# Altium PCB USB-PD-240W-PCB.PcbDoc (part 3 of 3)
Units mil, origin at the board's own origin, x right, y up, seen from the top; angles counter-clockwise.
Board outline 3858.27 x 2834.65 mil, 6 copper layers (L1 Top, L2 GND, L3 Power, L4 Power, L5 GND, L6 Bottom), stack 61.496 mil thick; 154 components, 83 nets, 633 pads, 831 vias.
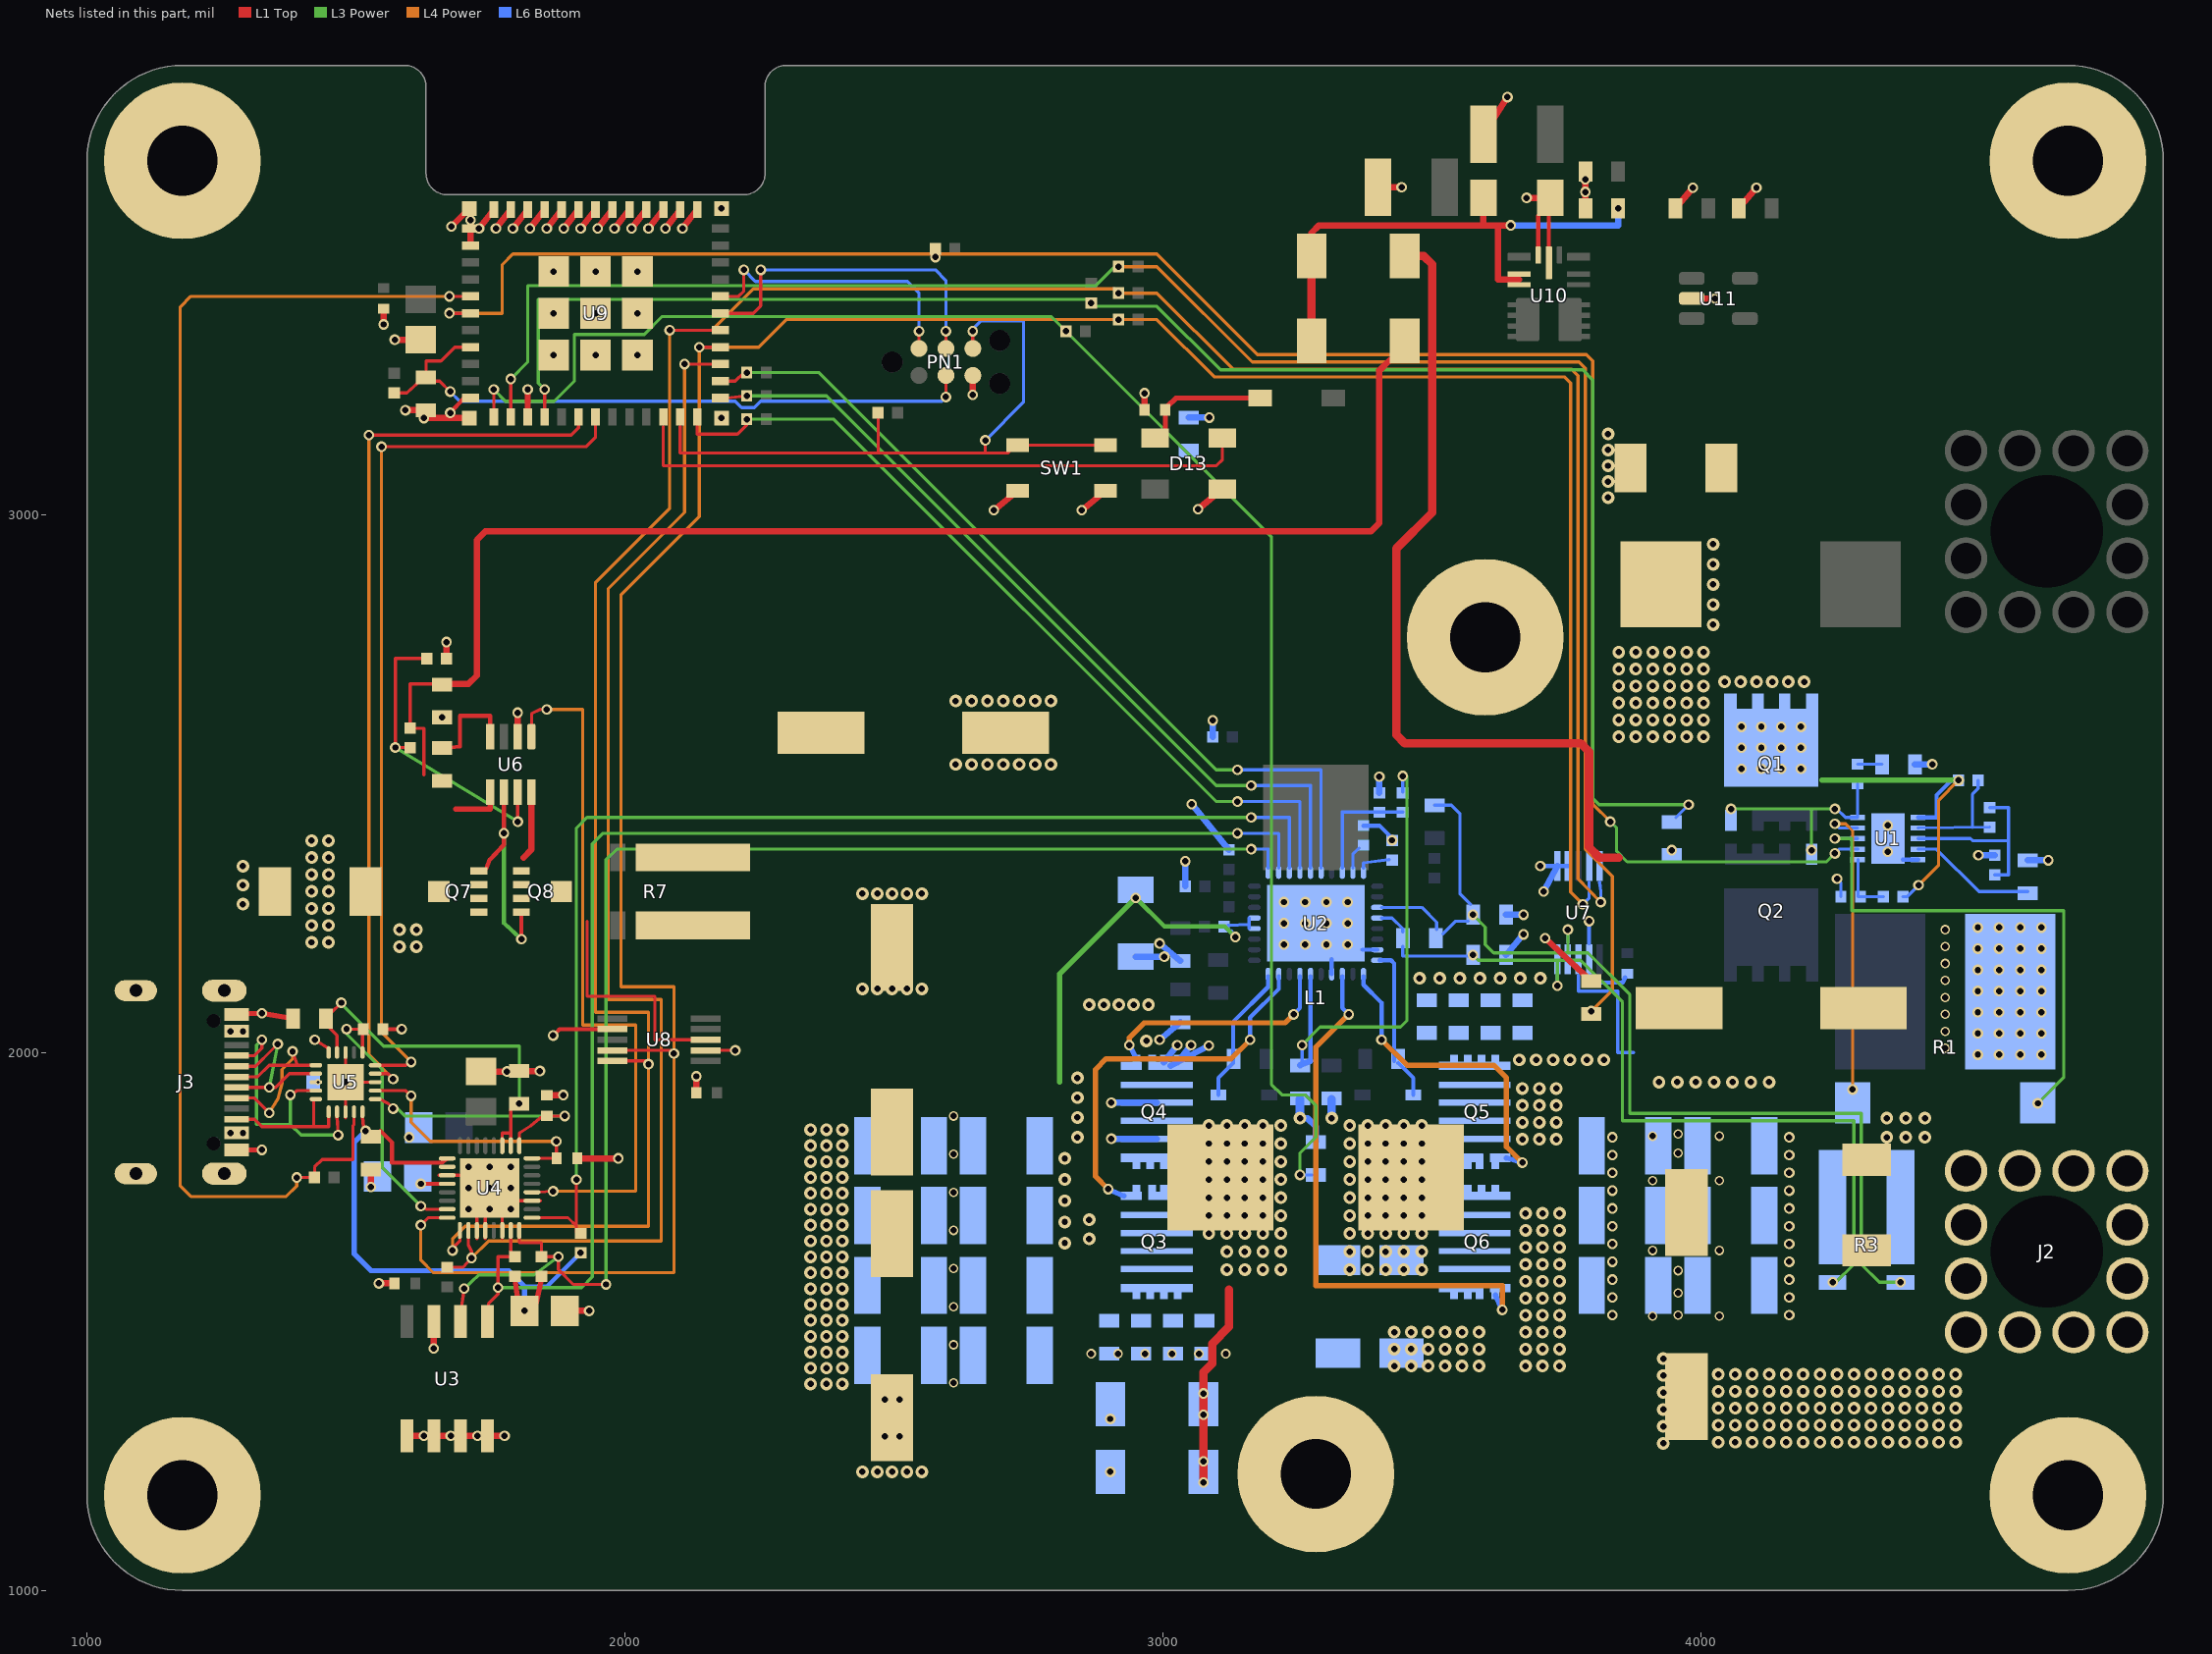
[diagram p6: the nets of this part, all layers, seen from the top]

## Via types
v1: diameter 23.62, hole 11.81, L1 Top to L6 Bottom, tented both sides, 435 vias
v2: diameter 19.68, hole 11.81, L1 Top to L6 Bottom, tented both sides, 351 vias
v3: diameter 17.72, hole 11.81, L1 Top to L6 Bottom, tented both sides, 35 vias
v4: diameter 23.62, hole 11.81, L1 Top to L6 Bottom, 9 vias
v5: diameter 11.81, hole 5.91, L1 Top to L6 Bottom, tented both sides, 1 vias

## Nets (pads, with @x,y where several pads share a name; then routed paths per layer and width w, separated by ;. In a path a pad name is that pad's centre, name@x,y a point inside that pad or via, vN(x,y) a via of type N, cw(c..) or ccw(c..) an arc to the next point about the centre after c; other vN are vias at no path point) (continued)
BQ_HIDRV1: Q3.G U2.27 | length 714.8
  L4 Power w9.84: v2(2897.64,1746.06) 2874.02,1769.68 2874.02,1968.5 2893.7,1988.19 3125.98,1988.19 v2(3161.42,2023.62)
  L6 Bottom w7.87: v2(3161.42,2023.62) 3161.42,2064.96 3214.57,2118.11 U2.27@3214.57,2141.73
  L6 Bottom w9.84: v2(2897.64,1746.06) Q3.G@2927.17,1733.27
BQ_HIDRV2: Q5.G U2.19 | length 594.1
  L4 Power w9.84: v2(3405.51,2023.62) 3452.76,1976.38 3614.17,1976.38 3637.8,1952.76 3637.8,1824.8 v2(3667.32,1795.28)
  L6 Bottom w7.87: U2.19@3372.05,2141.73 3372.05,2125.98 3405.51,2092.52 v2(3405.51,2023.62)
  L6 Bottom w9.84: Q5.G@3637.8,1804.13 v2(3667.32,1795.28)
BQ_ICHG: R17.2 U2.9 | length 42.3
  L6 Bottom w5.91: U2.9@3352.36,2342.52 3352.36,2368.11 R17.2@3364.17,2379.92
BQ_ILIM: R18.2 U2.10 | length 57.5
  L6 Bottom w5.91: U2.10@3372.05,2342.52 3372.05,2352.36 R18.2@3419.29,2358.27
BQ_INT: R24.1 U2.3 U4.17 | length 2256.8
  L1 Top w5.91: U4.17@1838.58,1692.91 1893.7,1692.91 1909.45,1677.17 ; R24.1@1909.45,1665.35 v2(1909.45,1763.78)
  L3 Power w5.91: v2(1909.45,1763.78) 1909.45,2417.32 1929.13,2437.01 v2(3163.39,2437.01)
  L6 Bottom w5.91: v2(3163.39,2437.01) 3234.25,2437.01 U2.3@3234.25,2342.52
BQ_LODRV1: Q4.G U2.25 | length 441.2
  L4 Power w9.84: v2(2937.01,2013.78) 2937.01,2027.56 2964.57,2055.12 3226.38,2055.12 v2(3242.13,2070.87)
  L6 Bottom w7.87: v2(3242.13,2070.87) 3253.94,2082.68 U2.25@3253.94,2141.73
  L6 Bottom w9.84: v2(2937.01,2013.78) Q4.G@2949.8,1988.19
BQ_LODRV2: Q6.G U2.21 | length 1027.1
  L4 Power w9.84: v2(3344.49,2070.87) 3283.46,2009.84 3283.46,1566.93 3629.92,1566.93 v2(3629.92,1521.65)
  L6 Bottom w7.87: U2.21@3332.68,2141.73 3332.68,2082.68 v2(3344.49,2070.87)
  L6 Bottom w9.84: Q6.G@3617.13,1549.21 v2(3629.92,1521.65)
BQ_PG: R27.1 U2.6 U9.26 | length 1599.7
  L1 Top w5.91: U9.26@2188.98,3248.03 2204.72,3248.03 2220.47,3263.78 v2(2225.98,3263.78)
  L3 Power w5.91: v2(2225.98,3263.78) 2360.24,3263.78 3098.43,2525.59 v2(3137.8,2525.59)
  L6 Bottom w5.91: v2(3137.8,2525.59) 3293.31,2525.59 U2.6@3293.31,2342.52
BQ_REGN: C36.2 R19.2 U2.24 | length 914
  L3 Power w5.91: v2(3257.87,2013.78) 3291.34,2047.24 3440.94,2047.24 3452.76,2059.06 3452.76,2513.78 v2(3444.88,2513.78)
  L6 Bottom w5.91: C36.2@3257.87,1984.25 v2(3257.87,2013.78) ; R19.2@3444.88,2484.25 v2(3444.88,2513.78)
  L6 Bottom w7.87: 3273.62,1984.25 U2.24@3273.62,2141.73
  L6 Bottom w11.81: C36.2@3253.94,1976.38 3273.62,1984.25
BQ_SRN: C32.2 C34.1 R3.4 R22.2 U2.13 U7.9 | length 1873.7
  L3 Power w5.91: v2(3575.59,2255.91) 3598.43,2233.07 3598.43,2200.79 3614.17,2185.04 3789.37,2185.04 3867.13,2107.28 3867.13,1886.81 4297.24,1886.81 4297.24,1606.3 4330.71,1572.83 v2(4370.08,1572.83) ; 3751.97,2185.04 v2(3751.97,2228.35)
  L6 Bottom w5.91: U2.13@3405.51,2269.68 3480.32,2269.68 3507.87,2242.13 C34.1@3507.87,2228.35 ; R22.2@3503.94,2459.84 3535.43,2459.84 3551.18,2444.09 3551.18,2295.28 3570.87,2275.59 ; C34.1@3519.68,2220.47 3543.31,2244.09 C32.2@3566.93,2244.09 ; 3751.97,2202.76 v2(3751.97,2228.35)
BQ_SRP: C31.2 C34.2 R3.3 U2.14 U7.10 | length 1544.7
  L3 Power w5.91: v2(3575.59,2181.1) 3585.43,2171.26 3775.59,2171.26 3853.35,2093.5 3853.35,1873.03 4283.46,1873.03 4283.46,1606.3 4250,1572.83 v2(4244.09,1572.83) ; v2(3732.28,2124.02) 3732.28,2171.26
  L6 Bottom w5.91: U2.14@3405.51,2250 3425.2,2250 3444.88,2230.32 C34.2@3444.88,2224.41 ; C34.2@3444.88,2196.85 3444.88,2179.13 C31.2@3566.93,2179.13 ; v2(3732.28,2124.02) 3732.28,2143.7
BQ_STAT1: R25.1 U2.4 U9.24 | length 1579.5
  L1 Top w5.91: U9.24@2133.86,3173.23 2133.86,3149.61 2208.66,3149.61 2225.98,3166.93 v2(2225.98,3177.17)
  L3 Power w5.91: v2(2225.98,3177.17) 2387.8,3177.17 3098.43,2466.54 v2(3137.8,2466.54)
  L6 Bottom w5.91: v2(3137.8,2466.54) 3253.94,2466.54 U2.4@3253.94,2342.52
BQ_STAT2: R26.1 U2.5 U9.25 | length 1538.5
  L1 Top w5.91: U9.25@2188.98,3216.54 v2(2225.98,3220.47)
  L3 Power w5.91: v2(2225.98,3220.47) 2374.02,3220.47 3098.43,2496.06 v2(3163.39,2496.06)
  L6 Bottom w5.91: v2(3163.39,2496.06) 3273.62,2496.06 U2.5@3273.62,2342.52
BQ_SW1: C38.1 D3.A D5.K D6.K L1.1 Q3.S Q4.D U2.28 | length 636.5
  L1 Top w15.75: v2(3074.8,1200.79) 3074.8,1405.51 3091.14,1421.85 3091.14,1458.66 3122.05,1490.16 3122.05,1559.06
  L6 Bottom w7.87: D3.A@3102.36,1921.26 3102.36,1952.76 3129.92,1980.32 3129.92,2057.09 3194.88,2122.05 U2.28@3194.88,2141.73
  other v1: 3118.11,1596.46 3151.57,1596.46 3185.04,1596.46 3218.5,1596.46 3118.11,1629.92 3151.57,1629.92 3185.04,1629.92 3218.5,1629.92 3084.65,1663.39 3118.11,1663.39 3151.57,1663.39 3185.04,1663.39 3218.5,1663.39 3084.65,1696.85 3118.11,1696.85 3151.57,1696.85 3185.04,1696.85 3218.5,1696.85 3084.65,1730.32 3118.11,1730.32 3151.57,1730.32 3185.04,1730.32 3218.5,1730.32 3084.65,1763.78 3118.11,1763.78 3151.57,1763.78 3185.04,1763.78 3218.5,1763.78 3084.65,1797.24 3118.11,1797.24 3151.57,1797.24 3185.04,1797.24 3218.5,1797.24 3084.65,1830.71 3118.11,1830.71 3151.57,1830.71 3185.04,1830.71 3218.5,1830.71 3084.65,1864.17 3118.11,1864.17 3151.57,1864.17 3185.04,1864.17 3218.5,1864.17
  other v2: 3074.8,1240.16 3074.8,1326.77 3074.8,1366.14
BQ_SW2: C39.1 D4.A D7.K D8.K L1.2 Q5.S Q6.D U2.18 | length 281.6
  L6 Bottom w7.87: U2.18@3401.57,2171.26 3423.23,2171.26 3429.13,2165.35 C39.1@3429.13,1984.25 ; C39.1@3437.01,1980.32 3464.57,1952.76 D4.A@3464.57,1921.26
  other v1: 3346.46,1596.46 3379.92,1596.46 3413.39,1596.46 3446.85,1596.46 3480.32,1596.46 3346.46,1629.92 3379.92,1629.92 3413.39,1629.92 3446.85,1629.92 3480.32,1629.92 3346.46,1663.39 3379.92,1663.39 3413.39,1663.39 3446.85,1663.39 3480.32,1663.39 3346.46,1696.85 3379.92,1696.85 3413.39,1696.85 3446.85,1696.85 3480.32,1696.85 3346.46,1730.32 3379.92,1730.32 3413.39,1730.32 3446.85,1730.32 3480.32,1730.32 3346.46,1763.78 3379.92,1763.78 3413.39,1763.78 3446.85,1763.78 3480.32,1763.78 3346.46,1797.24 3379.92,1797.24 3413.39,1797.24 3446.85,1797.24 3480.32,1797.24 3346.46,1830.71 3379.92,1830.71 3413.39,1830.71 3446.85,1830.71 3480.32,1830.71 3346.46,1864.17 3379.92,1864.17 3413.39,1864.17 3446.85,1864.17 3480.32,1864.17
BQ_TS: R19.1 R20.2 U2.8 | length 216.5
  L6 Bottom w5.91: U2.8@3332.68,2342.52 3332.68,2446.85 R19.1@3444.88,2446.85
CHS: J3.S1 J3.S2 J3.S3 J3.S4 MH1.1 MH2.1 MH3.1 MH4.1 MH5.1 MH6.1 R43.2
ESP_BOOT: PN1.6 R44.1 SW1.1 U9.23 | length 1260.6
  L1 Top w5.91: 2102.36,3163.39 2102.36,3114.17 2710.63,3114.17 SW1.1@2716.54,3120.08 ; 2470.08,3114.17 2470.08,3177.17 ; PN1.6@2646.06,3314.96 v2(2646.06,3340.55) ; 2669.29,3114.17 v2(2669.29,3137.8) ; SW1.1@2748.03,3128.94 SW1.1@2874.02,3128.94
  L6 Bottom w5.91: v2(2646.06,3340.55) 2646.06,3344.88 2661.42,3360.24 2740.16,3360.24 2740.16,3208.66 v2(2669.29,3137.8)
ESP_EN: C57.2 PN1.3 R34.1 U9.8 | length 1209.7
  L1 Top w5.91: R34.1@1570.87,3225.98 1594.49,3225.98 1614.17,3244.09 1629.92,3254.72 1629.92,3285.43 1657.48,3285.43 1683.07,3311.02 U9.8@1712.6,3311.02 ; C57.2@1641.73,3248.03 1655.12,3248.03 v2(1674.8,3228.35) ; v2(2596.06,3218.5) PN1.3@2596.06,3251.97
  L6 Bottom w5.91: v2(1674.8,3228.35) 1692.52,3210.63 2204.72,3210.63 2216.54,3198.82 2240.16,3198.82 2251.97,3210.63 2588.19,3210.63 v2(2596.06,3218.5)
ESP_RXD0: PN1.4 U9.30 | length 619.8
  L1 Top w5.91: U9.30@2177.17,3374.02 2238.19,3374.02 2251.97,3387.8 v2(2251.97,3454.72) ; PN1.4@2596.06,3314.96 v2(2596.06,3340.55)
  L6 Bottom w5.91: v2(2251.97,3454.72) 2576.38,3454.72 2596.06,3435.04 v2(2596.06,3340.55)
ESP_TXD0: PN1.2 U9.31 | length 526.7
  L1 Top w5.91: U9.31@2177.17,3405.51 2210.63,3405.51 2220.47,3415.35 v2(2220.47,3454.72) ; PN1.2@2546.06,3314.96 v2(2546.06,3340.55)
  L6 Bottom w5.91: v2(2220.47,3454.72) 2242.13,3433.07 2524.41,3433.07 2546.06,3411.42 v2(2546.06,3340.55)
ESP_USB_DN: U5.14 U9.17 | length 1652.6
  L1 Top w5.91: v2(1523.62,3147.64) 1899.61,3147.64 1913.39,3161.42 U9.17@1913.39,3173.23 ; U5.14@1543.31,1960.63 1559.06,1960.63 v2(1568.9,1950.79)
  L4 Power w5.91: v2(1523.62,3147.64) 1523.62,1996.06 v2(1568.9,1950.79)
ESP_USB_DP: U5.15 U9.18 | length 1661.7
  L1 Top w5.91: U5.15@1543.31,1976.38 1592.52,1976.38 v2(1602.36,1982.28) ; v2(1547.24,3125.98) 1927.17,3125.98 1944.88,3143.7 U9.18@1944.88,3173.23
  L4 Power w5.91: v2(1547.24,3125.98) 1547.24,2037.4 v2(1602.36,1982.28)
GND: C1.2 C2.2 C3.1 C4.1 C5.1 C6.1 C7.1 C8.1 C9.1 C10.1 C11.2 C12.1 C13.1 C14.1 C15.1 C16.1 C17.1 C18.2 C19.2 C20.1 C21.1 C22.1 C23.1 C24.1 C25.1 C26.1 C27.1 C28.1 C29.1 C30.1 C31.1 C32.1 C35.1 C36.1 C37.1 C40.1 C41.1 C42.1 C43.1 C45.1 C46.1 C47.1 C48.1 C49.1 C50.1 C51.1 C52.1 C53.1 C54.1 C55.1 C56.1 C57.1 C58.1 C59.1 C60.1 C61.1 C62.1 C63.1 C64.1 C65.1 C66.1 D1.A D2.A D5.A D6.A D7.A D8.A D9.A D13.1 J2.1 J3.A1_B12 J3.B1_A12 PN1.5 Q4.S Q6.S R4.2 R5.2 R6.2 R10.1 R15.1 R16.1 R17.1 R18.1 R20.1 R21.1 R29.1 R41.1 R42.1 R43.1 SW1.2 U1.5 U1.11 U2.17 U2.22 U2.37 U3.1 U3.2 U3.3 U3.4 U3.7 U4.3 U4.11 U4.12 U4.14 U4.19 U4.33 U5.8 U5.13 U5.18 U5.21 U6.2 U7.1 U7.2 U7.7 U8.2 U8.7 U9.1 U9.2 U9.11 U9.14 U9.36 U9.37 U9.38 U9.39 U9.40 U9.41 U9.42 U9.43 U9.44 U9.45 U9.46 U9.47 U9.48 U9.49 U9.50 U9.51 U9.52 U9.53 U10.10 U10.11 U11.2 | length 4603.6
  L1 Top w5.91: 1480.32,1877.95 U5.21@1480.32,1917.32 ; U5.21@1480.32,1968.5 U5.18@1480.31,2000 ; U5.21@1511.81,1944.88 U5.13@1535.43,1944.88 ; 1653.54,1771.65 1692.91,1771.65 ; 1724.41,1653.54 1724.41,1692.91 ; 1740.16,1653.54 1740.16,1692.91 ; 1771.65,1653.54 1771.65,1692.91 ; U4.33@1803.15,1724.41 U4.19@1842.52,1724.41 ; U8.7@2149.61,2003.94 v2(2204.72,2003.94)
  L1 Top w7.87: R42.1@1549.61,2043.31 v2(1584.65,2043.31) ; v2(1674.8,3188.98) U9.11@1700.79,3216.54 ; v2(1866.14,2031.5) 1877.95,2043.31 U8.2@1976.38,2043.31 ; U10.11@3696.85,3476.38 3696.85,3555.12 ; U10.10@3716.54,3468.5 3716.54,3555.12
  L1 Top w9.84: J3.B1_A12@1277.56,1818.9 v2(1324.8,1818.9) ; J3.A1_B12@1277.56,2070.87 v2(1324.8,2072.83) C43.1@1382.68,2062.99
  L1 Top w11.81: v2(1527.56,1749.96) C42.1@1527.56,1782.44 ; v2(1542.32,1570.87) C52.1@1571.34,1570.87 ; v2(1551.18,3353.31) C55.1@1551.18,3382.36 ; v2(1571.85,3324.8) C56.1@1620.08,3324.8 ; v2(1591.54,3193.86) C57.1@1629.92,3193.87 ; U3.1@1594.29,1287.4 v2(1625.79,1287.4) ; v2(1625.98,3179.13) U9.52@1710.63,3179.13 ; U3.2@1644.29,1287.4 v2(1675.79,1287.4) ; v2(1644.29,1449.8) U3.7@1644.29,1500 ; R29.1@1667.81,2732.28 v2(1667.8,2762.8) ; v2(1677.17,3535.43) U9.53@1710.63,3568.9 ; U3.3@1694.29,1287.4 v2(1725.79,1287.4) ; U9.2@1712.6,3500 v2(1712.6,3547.24) ; v2(1728.35,3531.5) U9.48@1755.91,3566.93 ; C49.1@1732.28,1964.57 v2(1780.51,1964.57) ; U3.4@1744.29,1287.4 v2(1775.79,1287.4) ; v2(1759.84,3531.5) U9.47@1787.4,3566.93 ; v2(1791.34,3531.5) U9.46@1818.9,3566.93 ; U6.2@1800.2,2587.01 v2(1800.2,2631.5) ; C46.1@1803.15,1965.59 v2(1841.54,1965.59) ; U9.14@1818.9,3181.1 v2(1818.9,3232.28) ; v2(1822.83,3531.5) U9.45@1850.39,3566.93 ; C51.1@1854.33,1920.79 v2(1884.84,1920.79) ; v2(1854.33,3531.5) U9.44@1881.89,3566.93 ; v2(1885.83,3531.5) U9.43@1913.39,3566.93 ; C48.1@1887.8,1519.68 v2(1933.07,1519.68) ; C50.1@1910.95,1803.15 v2(1987.2,1803.15) ; v2(1917.32,3531.5) U9.42@1944.88,3566.93 ; v2(1948.82,3531.5) U9.41@1976.38,3566.93 ; v2(1980.32,3531.5) U9.40@2007.87,3566.93 ; v2(2011.81,3531.5) U9.39@2039.37,3566.93 ; v2(2043.31,3531.5) U9.38@2070.87,3566.93 ; v2(2074.8,3531.5) U9.37@2102.36,3566.93 ; v2(2106.3,3531.5) U9.36@2133.86,3566.93 ; C54.1@2132.36,1925.2 v2(2132.36,1955.71) ; v2(2646.06,3222.24) PN1.5@2646.06,3258.46 ; v2(2685.04,3007.87) SW1.2@2729.33,3044.29 ; v2(2848.43,3007.87) SW1.2@2892.72,3044.29 ; C66.1@2965.04,3194.88 v2(2965.04,3225.39) ; v2(3064.57,3009.84) D13.1@3109.84,3047.24 ; C61.1@3398.62,3608.27 v2(3442.91,3608.27) ; C62.1@3595.47,3706.69 v2(3639.76,3775.83) ; v2(3675.2,3588.58) C59.1@3719.49,3588.58 ; v2(3709.65,2212.6) R5.2@3795.27,2132.87 ; C58.1@3784.42,3568.9 v2(3784.41,3623.03) ; v2(3784.41,3599.41) C60.1@3784.42,3637.8 ; C63.1@3951.74,3568.9 v2(3984.21,3607.28) ; U11.2@3982.09,3401.57 v2(4025.59,3401.57) ; C64.1@4069.84,3568.9 v2(4102.32,3607.28)
  L6 Bottom w5.91: v2(4251.97,2322.83) 4259.45,2314.96 R41.1@4259.35,2289.37
  L6 Bottom w7.87: U2.22@3312.99,2145.67 U2.37@3312.99,2173.23 ; U2.37@3370.08,2190.94 U2.17@3397.64,2190.94 ; R17.1@3372.05,2421.65 3401.57,2421.65 R18.1@3425.2,2398.03 ; v2(3700.79,2346.46) U7.1@3732.28,2346.46 U7.2@3751.97,2346.46 ; 3791.34,2143.7 3791.34,2129.92 3854.33,2129.92 C53.1@3858.27,2139.76 ; 3791.34,2202.76 v2(3791.34,2244.09) ; U1.11@4374.02,2358.27 U1.5@4402.76,2358.27
  L6 Bottom w11.81: v2(2903.54,1839.57) Q4.S@2988.19,1839.57 ; v2(2903.54,1906.5) Q4.S@2988.19,1906.5 ; C35.1@2948.82,2178.15 v2(3001.97,2178.15) ; v2(2993.11,2023.58) C30.1@3031.5,2056.08 ; v2(2993.11,2202.72) C29.1@3031.5,2170.25 ; Q4.S@3000.98,1981.81 v2(3025.98,2013.78) ; Q4.S@3013.78,1975.39 v2(3084.65,2012.8) ; Q4.S@3026.57,1981.81 v2(3051.57,2013.78) ; R15.1@3040.85,2309.05 v2(3040.83,2355.32) ; R43.1@3047.24,3180.16 v2(3085.63,3180.16) ; v2(3052.91,2461.61) R16.1@3122.05,2376.48 ; R21.1@3092.03,2586.61 v2(3092.05,2617.13) ; v1(3253.94,1877.95) 3267.72,1877.95 3283.46,1862.2 R4.2@3283.46,1834.65 ; R20.1@3401.57,2482.78 v2(3401.57,2512.8) ; C31.1@3636.85,2181.1 v2(3669.33,2219.49) ; C32.1@3636.85,2255.91 v2(3669.33,2255.91) ; v2(3706.69,2299.21) U7.1@3732.28,2346.46 ; C28.1@4396.68,2535.83 v2(4429.17,2535.83) ; v2(4514.76,2366.61) R10.1@4545.28,2366.63 ; C65.1@4606.3,2357.31 v2(4644.69,2357.32)
  L6 Bottom w15.75: v1(3253.94,1877.95) C36.1@3253.94,1913.39 ; v1(3312.99,1877.95) C37.1@3312.99,1913.39
  other v1: 2440.94,1220.47 2468.5,1220.47 2496.06,1220.47 2523.62,1220.47 2551.18,1220.47 3929.13,1273.62 4031.5,1275.59 4062.99,1275.59 4094.49,1275.59 4125.98,1275.59 4157.48,1275.59 4188.98,1275.59 4220.47,1275.59 4251.97,1275.59 4283.46,1275.59 4314.96,1275.59 4346.46,1275.59 4377.95,1275.59 4409.45,1275.59 4440.94,1275.59 4472.44,1275.59 3929.13,1305.12 4031.5,1307.09 4062.99,1307.09 4094.49,1307.09 4125.98,1307.09 4157.48,1307.09 4188.98,1307.09 4220.47,1307.09 4251.97,1307.09 4283.46,1307.09 4314.96,1307.09 4346.46,1307.09 4377.95,1307.09 4409.45,1307.09 4440.94,1307.09 4472.44,1307.09 3929.13,1336.61 4031.5,1338.58 4062.99,1338.58 4094.49,1338.58 4125.98,1338.58 4157.48,1338.58 4188.98,1338.58 4220.47,1338.58 4251.97,1338.58 4283.46,1338.58 4314.96,1338.58 4346.46,1338.58 4377.95,1338.58 4409.45,1338.58 4440.94,1338.58 4472.44,1338.58 3929.13,1368.11 4031.5,1370.08 4062.99,1370.08 4094.49,1370.08 4125.98,1370.08 4157.48,1370.08 4188.98,1370.08 4220.47,1370.08 4251.97,1370.08 4283.46,1370.08 4314.96,1370.08 4346.46,1370.08 4377.95,1370.08 4409.45,1370.08 4440.94,1370.08 4472.44,1370.08 3929.13,1399.61 4031.5,1401.57 4062.99,1401.57 4094.49,1401.57 4125.98,1401.57 4157.48,1401.57 4188.98,1401.57 4220.47,1401.57 4251.97,1401.57 4283.46,1401.57 4314.96,1401.57 4346.46,1401.57 4377.95,1401.57 4409.45,1401.57 4440.94,1401.57 4472.44,1401.57 3429.13,1417.32 3460.63,1417.32 3492.13,1417.32 3523.62,1417.32 3555.12,1417.32 3586.61,1417.32 3673.23,1417.32 3704.72,1417.32 3736.22,1417.32 3929.13,1431.1 3429.13,1448.82 3460.63,1448.82 3492.13,1448.82 3523.62,1448.82 3555.12,1448.82 3586.61,1448.82 3673.23,1448.82 3704.72,1448.82 3736.22,1448.82 3429.13,1480.32 3460.63,1480.32 3492.13,1480.32 3523.62,1480.32 3555.12,1480.32 3586.61,1480.32 3673.23,1480.32 3704.72,1480.32 3736.22,1480.32 3673.23,1511.81 3704.72,1511.81 3736.22,1511.81 3673.23,1543.31 3704.72,1543.31 3736.22,1543.31 3673.23,1574.8 3704.72,1574.8 3736.22,1574.8 3673.23,1606.3 3704.72,1606.3 3736.22,1606.3 3673.23,1637.8 3704.72,1637.8 3736.22,1637.8 3673.23,1669.29 3704.72,1669.29 3736.22,1669.29 3673.23,1700.79 3704.72,1700.79 3736.22,1700.79 2840.55,1842.52 2840.55,1879.25 2840.55,1916.02 2840.55,1952.76 2968.5,2021.65 2862.2,2088.58 2889.76,2088.58 2917.32,2088.58 2944.88,2088.58 2972.44,2088.58 2440.94,2118.11 2468.5,2118.11 2496.06,2118.11 2523.62,2118.11 2551.18,2118.11 3476.38,2137.8 3513.78,2137.8 3551.18,2137.8 3588.58,2137.8 3625.98,2137.8 3663.39,2137.8 3700.79,2137.8 1289.37,2275.59 2440.94,2295.28 2468.5,2295.28 2496.06,2295.28 2523.62,2295.28 2551.18,2295.28 1289.37,2311.02 1289.37,2346.46 2614.17,2535.43 2643.7,2535.43 2673.23,2535.43 2702.76,2535.43 2732.28,2535.43 2761.81,2535.43 2791.34,2535.43 2614.17,2653.54 2643.7,2653.54 2673.23,2653.54 2702.76,2653.54 2732.28,2653.54 2761.81,2653.54 2791.34,2653.54 3826.77,3031.5 3826.77,3061.02 3826.77,3090.55 3826.77,3120.08 3826.77,3149.61
  other v2: 2901.57,1220.47 2482.28,1286.42 2509.84,1286.42 2901.57,1318.9 2482.28,1355.32 2509.84,1355.32 1598.43,1842.52 1480.32,1944.88 3224.41,2200.79 3263.78,2200.79 3303.15,2200.79 3342.52,2200.79 3224.41,2240.16 3263.78,2240.16 3303.15,2240.16 3342.52,2240.16 3224.41,2279.53 3263.78,2279.53 3303.15,2279.53 3342.52,2279.53 4346.46,2373.23 3944.88,2375.98 3425.2,2394.49 4346.46,2422.05 1659.45,2622.83 2179.13,3179.13 1867.13,3296.26 1944.88,3296.26 2022.64,3296.26 1867.13,3374.02 1944.88,3374.02 2022.64,3374.02 1867.13,3451.77 1944.88,3451.77 2022.64,3451.77 2179.13,3568.9
  other v3: 2610.24,1385.83 2866.14,1440.16 2916.14,1440.16 2966.14,1440.16 3016.14,1440.16 3066.14,1440.16 3116.14,1440.16 2610.24,1456.69 3909.45,1509.84 4033.46,1509.84 3956.69,1511.81 2610.24,1527.56 3956.69,1553.15 3956.69,1594.49 2610.24,1598.43 3909.45,1631.89 4033.46,1631.89 2610.24,1669.29 2610.24,1740.16 3909.45,1761.81 4033.46,1761.81 2610.24,1811.02 3956.69,1812.99 3909.45,1844.49 4033.46,1844.49 3956.69,1848.43 2610.24,1881.89 4453.15,2007.87 4453.15,2039.37 4453.15,2070.87 4453.15,2102.36 4453.15,2133.86 4453.15,2165.35 4453.15,2196.85 4453.15,2228.35
  other v4: 1708.66,1708.66 1748.03,1708.66 1787.4,1708.66 1708.66,1748.03 1748.03,1748.03 1787.4,1748.03 1708.66,1787.4 1748.03,1787.4 1787.4,1787.4
I2C_SCL: R35.1 U4.9 U7.5 U8.5 U9.29 | length 5187.6
  L1 Top w5.91: v2@1679.13,1635.83 1692.91,1649.61 U4.9@1692.91,1657.48 ; U8.5@2000,1984.25 v2@2037.4,1984.25 ; v2(2082.68,3342.52) U9.29@2169.29,3342.52
  L4 Power w5.91: v2(1679.13,1631.89) 1679.13,1653.54 1702.76,1677.17 2043.31,1677.17 2043.31,2074.8 1944.88,2074.8 1944.88,2874.02 2082.68,3011.81 v2(2082.68,3342.52) 2161.42,3342.52 2238.19,3419.29 2909.06,3419.29 v2(2916.93,3411.42) 2988.19,3411.42 3129.92,3269.68 3758.86,3269.68 3770.67,3257.87 3770.67,2322.83 v2(3812.99,2279.53)
  L6 Bottom w5.91: 3811.02,2316.93 3812.99,2299.21 v2(3812.99,2279.53)
  other v2: 2043.31,1978.35
I2C_SDA: R36.1 U4.8 U7.4 U8.4 U9.28 | length 5307.4
  L1 Top w5.91: v2(1620.08,1679.13) 1633.86,1692.91 U4.8@1659.45,1692.91 ; U8.4@2000,2003.94 2084.65,2003.94 v2(2090.55,1998.03) ; v2(2137.8,3311.02) U9.28@2169.29,3311.02
  L4 Power w5.91: v2(1620.08,1679.13) 1620.08,1614.17 1643.7,1590.55 2090.55,1590.55 2090.55,2122.05 1992.13,2122.05 1992.13,2850.39 2137.8,2996.06 v2(2137.8,3311.02) 2248.03,3311.02 2299.21,3362.2 v2(2916.93,3362.2) 2988.19,3362.2 3094.49,3255.91 3745.08,3255.91 3756.89,3244.09 3756.89,2298.23 v2(3779.53,2275.59)
  L6 Bottom w5.91: v2(3779.53,2275.59) 3791.34,2287.4 3791.34,2316.93
I2CC_SCL: R32.1 U2.1 U3.6 U4.16 | length 2520
  L1 Top w5.91: U3.6@1694.88,1519.68 v2(1700.79,1561.02) ; U4.16@1803.15,1657.48 1803.15,1646.46 1844.49,1646.46 R32.1@1844.49,1629.92 ; R32.1@1850.39,1620.47 v2(1875.98,1620.47) 1875.98,1596.46 1903.54,1568.9 v2(1964.57,1568.9)
  L3 Power w5.91: v2(1700.79,1561.02) 1728.35,1586.61 1830.71,1586.61 v2(1875.98,1620.47) ; v2(1964.57,1568.9) 1964.57,2358.27 1984.25,2377.95 v2(3163.39,2377.95)
  L6 Bottom w5.91: v2(3163.39,2377.95) 3194.88,2377.95 U2.1@3194.88,2342.52
I2CC_SDA: R33.1 U2.2 U3.5 U4.15 | length 2500.4
  L1 Top w5.91: U3.5@1746.06,1519.68 1746.06,1533.46 1763.78,1551.18 1763.78,1620.47 R33.1@1787.4,1620.47 ; R33.1@1787.4,1625.98 U4.15@1787.4,1657.48
  L3 Power w5.91: v2(1763.78,1562.99) 1919.29,1562.99 1938.98,1582.68 1938.98,2387.8 1958.66,2407.48 v2(3137.8,2407.48)
  L6 Bottom w5.91: v2(3137.8,2407.48) 3214.57,2407.48 U2.2@3214.57,2342.52
LM_GATE: Q7.G Q8.G U6.6 | length 390.3
  L1 Top w7.87: Q7.G@1742.13,2342.52 1748.03,2358.27 1774.8,2385.83 U6.6@1774.8,2464.57 ; v2(1807.09,2210.63) Q8.G@1807.09,2255.91
  L3 Power w7.87: v2(1774.8,2407.48) 1774.8,2240.16 v2(1807.09,2210.63)
LM_OV: R28.1 R29.2 U6.7 | length 535.7
  L1 Top w5.91: R28.1@1590.55,2566.93 v2(1572.83,2566.93) 1572.83,2732.28 R29.2@1624.02,2732.28 ; U6.7@1800,2464.57 v2(1800.39,2429.13)
  L3 Power w5.91: v2(1572.83,2566.93) v2(1800.39,2429.13)
LM_VCAP: C44.2 U6.4 | length 150.5
  L1 Top w7.87: C44.2@1675.2,2566.93 1692.91,2568.9 1692.91,2625.98 1748.82,2625.98 U6.4@1748.82,2606.3
LTC_FAULT: R11.1 U1.7 U9.6 | length 3741.2
  L1 Top w5.91: v2(1673.23,3374.02) U9.6@1712.6,3374.02
  L3 Power w5.91: v2(3830.71,2429.13) 3842.52,2417.32 3842.52,2374.02 3862.2,2354.33 4232.28,2354.33 v2(4248.03,2370.08)
  L4 Power w5.91: v2(1673.23,3374.02) 1771.65,3374.02 1771.65,3464.57 1791.34,3484.25 2988.19,3484.25 3175.2,3297.24 3786.42,3297.24 3798.23,3285.43 3798.23,2461.61 v2(3830.71,2429.13)
  L6 Bottom w5.91: v2(4248.03,2370.08) 4255.91,2377.95 U1.7@4290.55,2377.95
  other v2: 2576.38,3478.35
LTC_GATE: Q1.G Q2.G R12.2 U1.10 | length 380.9
  L3 Power w5.91: v2(4055.12,2452.76) v2(4248.03,2452.76) ; v2(4204.72,2375.98) 4204.72,2452.76
  L6 Bottom w5.91: v2(4248.03,2452.76) 4251.97,2452.76 4267.72,2437.01 4290.16,2437.01 R12.2@4290.16,2499.61
LTC_GATE_RC: C28.2 R12.1 | length 45.3
  L6 Bottom w5.91: R12.1@4290.16,2535.83 C28.2@4335.43,2535.83
LTC_OV: R9.1 R10.2 U1.3 | length 355.6
  L6 Bottom w5.91: U1.3@4402.76,2397.64 4500,2397.64 4503.94,2393.7 4570.87,2393.7 ; R9.1@4535.43,2455.12 4570.87,2455.12 4570.87,2393.7 ; R10.2@4545.28,2330.32 4570.87,2330.32 4570.87,2393.7
LTC_RETRY: C65.2 U1.4 | length 236.2
  L6 Bottom w5.91: U1.4@4402.76,2377.95 4437.01,2377.95 4515.75,2299.21 C65.2@4606.3,2299.21
LTC_SENSE: R1.3 U1.9 | length 564.7
  L4 Power w5.91: v2(4248.03,2425.2) 4267.72,2425.2 4281.1,2411.81 v2(4281.1,1931.1)
  L6 Bottom w5.91: v2(4248.03,2425.2) 4255.91,2417.32 U1.9@4290.16,2417.32
LTC_SHDN: R40.1 R41.2 U1.6 | length 115.7
  L6 Bottom w5.91: U1.6@4291.34,2358.27 4291.34,2289.37 R40.1@4338.19,2289.37
LTC_UV: R8.1 R9.2 U1.2 | length 224.7
  L6 Bottom w5.91: U1.2@4402.76,2417.32 R9.2@4535.43,2418.9 ; 4503.94,2418.11 4503.94,2480.32 4514.17,2490.55 R8.1@4514.17,2505.91
LTC_VOUT: R1.4 U1.8 | length 979.3
  L3 Power w5.91: v2(4248.03,2397.64) 4279.53,2397.64 4279.53,2263.78 4673.23,2263.78 4673.23,1953.54 v2(4625.2,1905.51)
  L6 Bottom w5.91: v2(4248.03,2397.64) U1.8@4290.16,2397.64
NTC1: R4.1 R37.1 U9.12 | length 3078.2
  L1 Top w5.91: U9.12@1755.91,3181.1 v2(1755.91,3232.28)
  L3 Power w5.91: v2(1755.91,3232.28) 1777.56,3210.63 1868.11,3210.63 1905.51,3248.03 1905.51,3334.65 2035.43,3334.65 2068.9,3368.11 2791.34,3368.11 v2(2818.9,3340.55) 3200.79,2958.66 3200.79,1940.94 3220.47,1921.26 3263.78,1921.26 3283.46,1901.57 3283.46,1842.52 3253.94,1812.99 v2(3253.94,1772.44)
  L6 Bottom w5.91: v2(3253.94,1772.44) R4.1@3283.46,1772.44
NTC2: R5.1 R38.1 U9.13 | length 3547.6
  L1 Top w5.91: U9.13@1787.4,3181.1 v2(1787.4,3251.97)
  L3 Power w5.91: v2(1787.4,3251.97) 1818.9,3283.46 1818.9,3425.2 2874.02,3425.2 2909.45,3460.63 v2(2916.93,3460.63)
  L4 Power w5.91: v2(2916.93,3460.63) 2988.19,3460.63 3165.35,3283.46 3772.64,3283.46 3784.45,3271.65 3784.45,2377.95 3834.65,2327.76 3834.65,2116.14 v2(3795.28,2076.77)
NTC3: R6.1 R39.1 U9.15 | length 3239
  L1 Top w5.91: U9.15@1850.39,3181.1 v2(1850.39,3232.28)
  L3 Power w5.91: v2(1850.39,3232.28) 1838.58,3244.09 1838.58,3399.61 2859.84,3399.61 v2(2866.14,3393.31) 2872.64,3386.81 2988.19,3386.81 3106.3,3268.7 3779.53,3268.7 3798.23,3250 3798.23,2472.44 3810.04,2460.63 v2(3976.38,2460.63)
  L6 Bottom w5.91: R6.1@3952.76,2437.01 v2(3976.38,2460.63)
PD_CC1: C50.2 U4.24 U5.12 | length 447.9
  L1 Top w5.91: U5.12@1543.31,1929.13 1592.52,1929.13 v2(1602.36,1919.29) ; U4.24@1838.58,1803.15 C50.2@1866.14,1803.15 ; C50.2@1872.05,1811.02 v2(1872.05,1834.65)
  L4 Power w5.91: v2(1602.36,1919.29) 1602.36,1870.08 1637.8,1834.65 v2(1872.05,1834.65)
PD_CC2: C51.2 U4.25 U5.11 | length 447.2
  L1 Top w5.91: U5.11@1543.31,1913.39 1559.06,1905.51 v2(1568.9,1895.67) ; U4.25@1803.15,1838.58 1803.15,1850.39 1824.8,1864.17 C51.2@1846.46,1881.89 ; C51.2@1862.2,1881.89 v2(1887.8,1881.89)
  L3 Power w5.91: v2(1568.9,1895.67) 1576.77,1895.67 1590.55,1881.89 v2(1887.8,1881.89)
PD_IRQ: R30.1 U4.10 U9.27 | length 2297.3
  L1 Top w5.91: R30.1@1677.17,1600.79 1698.82,1600.79 v2(1714.57,1618.11) 1714.57,1629.92 1708.66,1641.73 U4.10@1708.66,1657.48 ; v2(2110.24,3279.53) U9.27@2169.29,3279.53
  L4 Power w5.91: v2(1714.57,1618.11) 1746.06,1649.61 2066.93,1649.61 2066.93,2098.43 1968.5,2098.43 1968.5,2862.2 2110.24,3003.94 v2(2110.24,3279.53)
PD_LDO_1V5: C45.2 U4.4 | length 39.4
  L1 Top w7.87: v2(1620.08,1755.91) U4.4@1659.45,1755.91
PD_LDO_3V3: C42.2 C48.2 R24.2 R32.2 R33.2 U4.1 U4.2 U5.10 | length 1034
  L1 Top w5.91: U5.10@1511.81,1879.92 v2@1513.78,1862.2
  L1 Top w7.87: C42.2@1545.28,1854.33 1566.93,1832.68 1566.93,1795.28 1659.45,1795.28 U4.1@1669.29,1803.15
  L1 Top w9.84: R33.2@1795.28,1578.74 C48.2@1801.18,1535.43 ; C48.2@1834.65,1535.43 R32.2@1844.49,1578.74
  L6 Bottom w7.87: 1812.99,1564.96 1854.33,1564.96 v2(1917.32,1627.56)
  L6 Bottom w9.84: v2(1517.72,1854.33) 1496.06,1832.68 1496.06,1625.98 1527.56,1594.49 1783.46,1594.49 1812.99,1564.96 v2(1812.99,1519.68)
PD_PP_EN: U4.20 U6.1 | length 1284.1
  L1 Top w5.91: U6.1@1825.98,2606.3 1825.98,2629.92 1842.52,2637.8 ; U4.20@1838.58,1740.16 v2(1866.14,1742.13)
  L4 Power w5.91: v2(1854.33,2637.8) 1921.26,2637.8 1921.26,2051.18 2019.68,2051.18 2019.68,1742.13 v2(1866.14,1742.13)
RGB_DIN: D13.2 U9.22 | length 1136.6
  L1 Top w5.91: 2070.87,3163.39 2070.87,3090.55 3098.43,3090.55 3109.84,3101.97 3109.84,3122.05
RGB_VDD: C66.2 D12.K D13.3 | length 199.4
  L1 Top w9.84: D13.3@3003.94,3153.54 C66.2@3003.94,3188.98 ; C66.2@3007.87,3200.79 3023.62,3216.54 D12.K@3165.35,3216.54
TPD_EPR_EN: R42.2 U4.7 U5.16 | length 474.9
  L1 Top w5.91: v2(1482.28,2043.31) R42.2@1505.91,2043.31 ; U5.16@1511.81,2007.87 R42.2@1511.81,2035.43 ; v2@1624.02,1714.57 1629.92,1708.66 U4.7@1659.45,1708.66
  L3 Power w5.91: v2(1482.28,2043.31) 1482.28,2034.45 1548.23,1968.5 1548.23,1786.42 v2(1620.08,1714.57)
TPD_FLT: R31.1 U5.9 U9.5 | length 2648.9
  L1 Top w5.91: v2(1389.76,1767.72) 1422.83,1767.72 1422.83,1787.01 1437.01,1801.18 1494.09,1801.18 1494.09,1864.17 1496.06,1866.14 U5.9@1496.06,1889.76 ; v2(1673.23,3405.51) U9.5@1712.6,3405.51
  L4 Power w5.91: v2(1389.76,1767.72) 1389.76,1751.97 1370.08,1732.28 1192.91,1732.28 1173.23,1751.97 1173.23,3385.83 1192.91,3405.51 v2(1673.23,3405.51)
TPD_VBIAS: C40.2 U5.3
  other v5: 1429.13,1944.88
TPD_VBUS_LV: C43.2 C46.2 U4.26 U4.27 U5.19 | length 630.8
  L1 Top w5.91: C43.2@1448.82,2047.24 1464.57,2031.5 U5.19@1464.57,2007.87 ; C43.2@1452.76,2072.83 v2(1472.44,2092.52) ; U4.27@1771.65,1838.58 1771.65,1850.39 1787.4,1850.39 ; U4.26@1787.4,1838.58 C46.2@1787.4,1895.67
  L3 Power w5.91: v2(1472.44,2092.52) 1472.44,2090.55 1551.18,2011.81 1803.15,2011.81 v2(1803.15,1904.72)
USB_CC1: J3.A5 U5.4 U5.7 | length 504.6
  L1 Top w5.91: J3.A5@1291.34,1994.09 1311.02,1994.09 1324.8,2007.87 v2(1324.8,2023.62) ; v2(1377.95,1921.26) 1389.76,1929.13 U5.4@1413.39,1929.13 ; U5.7@1464.57,1881.89 v2(1466.54,1846.46)
  L3 Power w5.91: v2(1324.8,2023.62) 1314.96,2013.78 1314.96,1866.14 1377.95,1866.14 ; v2(1377.95,1921.26) 1377.95,1866.14 ; v2(1466.54,1846.46) 1397.64,1846.46 1377.95,1866.14
USB_CC2: J3.B5 U5.5 U5.6 | length 234.1
  L1 Top w5.91: J3.B5@1291.34,1875.98 1311.02,1875.98 1324.8,1862.2 1448.82,1862.2 U5.6@1448.82,1881.89 ; 1421.26,1862.2 U5.5@1421.26,1913.39
USB_DN: J3.A7 J3.B7 U5.2 | length 295
  L1 Top w5.91: J3.A7@1291.34,1935.04 1350.39,1935.04 1375.98,1960.63 U5.2@1413.39,1960.63 ; J3.B7@1291.34,1974.41 1312.99,1974.41 1344.49,2005.91 v2(1354.33,2015.75)
  L3 Power w5.91: v2(1338.58,1935.04) v2(1354.33,2015.75)
USB_DP: J3.A6 J3.B6 U5.1 | length 342.4
  L1 Top w5.91: J3.B6@1291.34,1915.35 1311.02,1915.35 v2(1338.58,1887.8) ; J3.A6@1291.34,1954.72 1316.93,1954.72 1338.58,1976.38 U5.1@1413.39,1976.38 ; v2(1381.89,2001.97) 1389.76,1978.35
  L4 Power w5.91: v2(1338.58,1887.8) 1354.33,1913.39 1362.2,1942.91 1362.2,1968.5 1381.89,1988.19 v2(1381.89,2001.97)
V_BAT: C19.1 D2.K D10.A R1.2 R3.2 U7.8 | length 1801.5
  L1 Top w15.75: D10.A@3464.57,3480.32 3484.25,3480.32 3500,3464.57 3500,3003.94 3433.07,2937.01 3433.07,2590.55 3448.82,2574.8 3775.59,2574.8 3791.34,2559.06 3791.34,2381.89 3811.02,2362.2 3846.46,2362.2
  L6 Bottom w5.91: 3771.65,2143.7 3771.65,2114.17 3844.49,2114.17 3844.49,2000 3874.02,2000
  other v1: 4344.49,1842.52 4379.92,1842.52 4415.35,1842.52 4344.49,1877.95 4379.92,1877.95 4415.35,1877.95 3921.26,1944.88 3955.39,1944.88 3989.49,1944.88 4023.62,1944.88 4057.76,1944.88 4091.85,1944.88 4125.98,1944.88
  other v2: 4513.78,1996.06 4553.15,1996.06 4592.52,1996.06 4631.89,1996.06 4513.78,2035.43 4553.15,2035.43 4592.52,2035.43 4631.89,2035.43 4513.78,2074.8 4553.15,2074.8 4592.52,2074.8 4631.89,2074.8 4513.78,2114.17 4553.15,2114.17 4592.52,2114.17 4631.89,2114.17 4513.78,2153.54 4553.15,2153.54 4592.52,2153.54 4631.89,2153.54 4513.78,2192.91 4553.15,2192.91 4592.52,2192.91 4631.89,2192.91 4513.78,2232.28 4553.15,2232.28 4592.52,2232.28 4631.89,2232.28
V_FUSED: D1.K F1.2 Q1.D R8.2 R40.2 U1.1 | length 645.3
  L3 Power w9.84: 4224.41,2505.91 v2(4477.95,2505.91)
  L4 Power w5.91: v2(4403.54,2311.02) 4440.94,2348.43 4440.94,2468.9 v2(4477.95,2505.91)
  L6 Bottom w5.91: R40.2@4374.41,2289.37 4381.89,2289.37 v2(4403.54,2311.02)
  L6 Bottom w7.87: U1.1@4402.76,2437.01 4437.01,2437.01 4437.01,2478.35 4464.57,2505.91 v2(4477.95,2505.91)
  other v1: 3846.46,2586.61 3877.95,2586.61 3909.45,2586.61 3940.94,2586.61 3972.44,2586.61 4003.94,2586.61 3846.46,2618.11 3877.95,2618.11 3909.45,2618.11 3940.94,2618.11 3972.44,2618.11 4003.94,2618.11 3846.46,2649.61 3877.95,2649.61 3909.45,2649.61 3940.94,2649.61 3972.44,2649.61 4003.94,2649.61 3846.46,2681.1 3877.95,2681.1 3909.45,2681.1 3940.94,2681.1 3972.44,2681.1 4003.94,2681.1 4043.31,2688.98 4072.83,2688.98 4102.36,2688.98 4131.89,2688.98 4161.42,2688.98 4190.94,2688.98 3846.46,2712.6 3877.95,2712.6 3909.45,2712.6 3940.94,2712.6 3972.44,2712.6 4003.94,2712.6 3846.46,2744.09 3877.95,2744.09 3909.45,2744.09 3940.94,2744.09 3972.44,2744.09 4003.94,2744.09 4021.65,2795.28 4021.65,2832.68 4021.65,2870.08 4021.65,2907.48 4021.65,2944.88
  other v2: 4074.57,2527.36 4111.46,2527.36 4148.39,2527.36 4185.28,2527.36 4074.57,2566.34 4111.46,2566.34 4148.39,2566.34 4185.28,2566.34 4074.57,2605.32 4111.46,2605.32 4148.39,2605.32 4185.28,2605.32
V_SYS: C12.2 C13.2 C14.2 C15.2 C16.2 C17.2 C18.1 C24.2 C25.2 C26.2 C27.2 Q5.D R3.1
  other v1: 3667.32,1838.58 3698.82,1838.58 3730.32,1838.58 3667.32,1870.08 3698.82,1870.08 3730.32,1870.08 3667.32,1901.57 3698.82,1901.57 3730.32,1901.57 3667.32,1933.07 3698.82,1933.07 3730.32,1933.07 3661.42,1986.22 3692.91,1986.22 3724.41,1986.22 3755.91,1986.22 3787.4,1986.22 3818.9,1986.22
  other v2: 3834.65,1511.81 4163.39,1511.81 3834.65,1544.88 4163.39,1544.88 3834.65,1577.95 4163.39,1577.95 3834.65,1611.02 4163.39,1611.02 3834.65,1644.09 4163.39,1644.09 3834.65,1677.17 4163.39,1677.17 3834.65,1710.24 4163.39,1710.24 3834.65,1743.31 4163.39,1743.31 3834.65,1776.38 4163.39,1776.38 3834.65,1809.45 4163.39,1809.45 3834.65,1842.52 4163.39,1842.52
VAC: C1.1 C2.1 C3.2 C4.2 C5.2 C6.2 C7.2 C8.2 C9.2 C10.2 C20.2 C21.2 C22.2 C23.2 C35.2 Q3.D R7.1 R13.2 U2.32 U2.33 | length 689.7
  L3 Power w7.87: v2(2948.82,2287.4) 3001.97,2234.25 3114.17,2234.25 v2(3133.86,2214.57)
  L3 Power w9.84: 2807.09,1944.88 2807.09,2145.67 v2(2948.82,2287.4)
  L6 Bottom w5.91: R13.2@3120.08,2236.22 3159.45,2238.19 ; 3125.98,2226.38 v2(3133.86,2214.57) ; U2.32@3159.45,2230.32 U2.33@3159.45,2250
  other v1: 2344.49,1383.86 2374.02,1383.86 2403.54,1383.86 2344.49,1413.39 2374.02,1413.39 2403.54,1413.39 2344.49,1442.91 2374.02,1442.91 2403.54,1442.91 2344.49,1472.44 2374.02,1472.44 2403.54,1472.44 2344.49,1501.97 2374.02,1501.97 2403.54,1501.97 2344.49,1531.5 2374.02,1531.5 2403.54,1531.5 2344.49,1561.02 2374.02,1561.02 2403.54,1561.02 2344.49,1590.55 2374.02,1590.55 2403.54,1590.55 2344.49,1620.08 2374.02,1620.08 2403.54,1620.08 2816.93,1645.67 2344.49,1649.61 2374.02,1649.61 2403.54,1649.61 2862.2,1653.54 2344.49,1679.13 2374.02,1679.13 2403.54,1679.13 2816.93,1685.04 2862.2,1688.98 2344.49,1708.66 2374.02,1708.66 2403.54,1708.66 2816.93,1724.41 2344.49,1738.19 2374.02,1738.19 2403.54,1738.19 2816.93,1763.78 2344.49,1767.72 2374.02,1767.72 2403.54,1767.72 2344.49,1797.24 2374.02,1797.24 2403.54,1797.24 2816.93,1803.15 2344.49,1826.77 2374.02,1826.77 2403.54,1826.77 2344.49,1856.3 2374.02,1856.3 2403.54,1856.3
VAUX_IN: C58.2 C59.2 D10.K D11.K U10.2 U10.3 | length 969.5
  L1 Top w11.81: D10.K@3275.59,3480.32 3275.59,3523.62 3289.37,3537.4 3622.05,3537.4 ; 3594.49,3537.4 C59.2@3594.49,3559.06 ; v2(3645.67,3537.4) 3622.05,3537.4 ; 3661.42,3437.01 3622.05,3437.01 3622.05,3537.4
  L1 Top w15.75: D11.K@3275.59,3322.83 D10.K@3275.59,3480.32
  L6 Bottom w11.81: v2(3645.67,3537.4) 3845.67,3537.4 v2(3845.67,3568.9)
VBUS: C41.2 C44.1 D9.K D11.A J3.A4_B9 J3.B4_A9 Q7.D R28.2 U5.20 U6.5 | length 2647.1
  L1 Top w5.91: v2(1423.23,2023.62) U5.20@1448.82,2007.87 ; R28.2@1600.39,2610.24 1600.39,2685.04 C41.2@1643.7,2685.04 ; R28.2@1608.27,2602.76 1625.98,2602.36 1625.98,2515.75
  L1 Top w9.84: 1685.04,2452.76 1748.82,2452.76 U6.5@1748.82,2464.57
  L1 Top w11.81: C41.2@1665.35,2685.04 1708.66,2685.04 1724.41,2700.79 1724.41,2952.76 1740.16,2968.5 3385.83,2968.5 3401.57,2984.25 3401.57,3267.72 D11.A@3421.26,3287.4
  other v1: 1580.71,2196.85 1612.2,2196.85 1417.32,2204.72 1448.82,2204.72 1580.71,2228.35 1612.2,2228.35 1417.32,2236.22 1448.82,2236.22 1417.32,2267.72 1448.82,2267.72 1417.32,2299.21 1448.82,2299.21 1417.32,2330.71 1448.82,2330.71 1417.32,2362.2 1448.82,2362.2 1417.32,2393.7 1448.82,2393.7
  other v2: 1266.14,1850.39 1289.76,1850.39 1266.14,2039.37 1289.76,2039.37
VBUS_CS: Q7.S Q8.S U6.8 | length 108.3
  L1 Top w11.81: 1811.02,2362.2 1825.98,2377.95 U6.8@1825.98,2464.57
VBUS_SW: C11.1 Q8.D R7.2 U8.8 | length 440.9
  L1 Top w5.91: 1929.13,2244.09 1929.13,2104.33 2055.12,2104.33 2055.12,2023.62 U8.8@2149.61,2023.62
pads on no net: D13.4 J3. J3.A8 J3.B8 L1.3 PN1.MP U2.15 U2.16 U2.31 U4.5 U4.6 U4.13 U4.18 U4.21 U4.22 U4.23 U4.30 U4.31 U5.17 U6.3 U7.3 U8.3 U9.4 U9.7 U9.9 U9.10 U9.16 U9.20 U9.21 U9.32 U9.33 U9.34 U9.35 U10.1 U10.5 U10.6 U10.7 U11.4

## Polygon pours and split planes (outlines as drawn)
GND on L2 GND "GND_L2" (solid, remove dead copper, pour order 897): 1148.8,1016.28 1134.88,1019.36 1121.29,1023.65 1108.12,1029.1 1095.48,1035.68 1083.46,1043.34 1072.15,1052.02 1061.64,1061.64 1052.02,1072.15 1043.34,1083.46 1035.68,1095.48 1029.1,1108.12 1023.65,1121.29 1019.36,1134.88 1016.28,1148.8 1014.41,1162.93 1013.78,1177.46 1013.78,3657.18 1014.41,3671.72 1016.28,3685.85 1019.36,3699.76 1023.65,3713.36 1029.1,3726.52 1035.68,3739.17 1043.34,3751.19 1052.02,3762.49 1061.64,3773 1072.15,3782.63 1083.46,3791.31 1095.48,3798.96 1108.12,3805.55 1121.29,3811 1134.88,3815.29 1148.8,3818.37 1162.93,3820.23 1177.46,3820.87 1433.07,3820.87 1433.07,3582.68 1655,3582.68 1655.54,3582.51 1660.06,3581.5 1664.65,3580.9 1668.99,3580.71 2220.77,3580.71 2225.11,3580.9 2229.7,3581.5 2234.23,3582.51 2234.77,3582.68 2456.69,3582.68 2456.69,3820.87 4680.8,3820.87 4695.34,3820.23 4709.47,3818.37 4723.39,3815.29 4736.98,3811 4750.15,3805.55 4762.79,3798.96 4774.81,3791.31 4786.11,3782.63 4796.63,3773 4806.25,3762.49 4814.93,3751.19 4822.59,3739.17 4829.17,3726.52 4834.62,3713.36 4838.91,3699.76 4841.99,3685.85 4843.85,3671.72 4844.49,3657.18 4844.49,1177.46 4843.85,1162.93 4841.99,1148.8 4838.91,1134.88 4834.62,1121.29 4829.17,1108.12 4822.59,1095.48 4814.93,1083.46 4806.25,1072.15 4796.63,1061.64 4786.11,1052.02 4774.81,1043.34 4762.79,1035.68 4750.15,1029.1 4736.98,1023.65 4723.39,1019.36 4709.47,1016.28 4695.34,1014.41 4680.8,1013.78 1177.46,1013.78 1162.93,1014.41
GND on L5 GND "GND_L5" (solid, remove dead copper, pour order 898): 1148.8,1016.28 1134.88,1019.36 1121.29,1023.65 1108.12,1029.1 1095.48,1035.68 1083.46,1043.34 1072.15,1052.02 1061.64,1061.64 1052.02,1072.15 1043.34,1083.46 1035.68,1095.48 1029.1,1108.12 1023.65,1121.29 1019.36,1134.88 1016.28,1148.8 1014.41,1162.93 1013.78,1177.46 1013.78,3657.18 1014.41,3671.72 1016.28,3685.85 1019.36,3699.76 1023.65,3713.36 1029.1,3726.52 1035.68,3739.17 1043.34,3751.19 1052.02,3762.49 1061.64,3773 1072.15,3782.63 1083.46,3791.31 1095.48,3798.96 1108.12,3805.55 1121.29,3811 1134.88,3815.29 1148.8,3818.37 1162.93,3820.23 1177.46,3820.87 1433.07,3820.87 1433.07,3582.68 1655,3582.68 1655.54,3582.51 1660.06,3581.5 1664.65,3580.9 1668.99,3580.71 2220.77,3580.71 2225.11,3580.9 2229.7,3581.5 2234.23,3582.51 2234.77,3582.68 2456.69,3582.68 2456.69,3820.87 4680.8,3820.87 4695.34,3820.23 4709.47,3818.37 4723.39,3815.29 4736.98,3811 4750.15,3805.55 4762.79,3798.96 4774.81,3791.31 4786.11,3782.63 4796.63,3773 4806.25,3762.49 4814.93,3751.19 4822.59,3739.17 4829.17,3726.52 4834.62,3713.36 4838.91,3699.76 4841.99,3685.85 4843.85,3671.72 4844.49,3657.18 4844.49,1177.46 4843.85,1162.93 4841.99,1148.8 4838.91,1134.88 4834.62,1121.29 4829.17,1108.12 4822.59,1095.48 4814.93,1083.46 4806.25,1072.15 4796.63,1061.64 4786.11,1052.02 4774.81,1043.34 4762.79,1035.68 4750.15,1029.1 4736.98,1023.65 4723.39,1019.36 4709.47,1016.28 4695.34,1014.41 4680.8,1013.78 1177.46,1013.78 1162.93,1014.41
CHS on L6 Bottom "CHS_BOT_L6" (solid, remove dead copper, pour order 919): 1157.48,1023.62 1157.48,1086.61 4700.79,1086.61 4700.79,1023.62
CHS on L6 Bottom "CHS_L6" (solid, remove dead copper, pour order 918): 1086.61,1157.48 1023.62,1157.48 1023.62,3598.43 1086.61,3598.43 1086.61,3102.36 3015.75,3102.36 3015.75,3135.83 3078.74,3135.83 3078.74,3102.36 3535.43,3102.36 3535.43,3724.41 4622.05,3724.41 4622.05,3661.42 3629.92,3661.42 3629.92,2850.39 3535.43,2850.39 3535.43,3039.37 1086.61,3039.37 1086.61,2165.35 1232.28,2165.35 1232.28,1724.41 1086.61,1724.41
GND on L6 Bottom "GND_J2_L6" (solid, remove dead copper, pour order 917): 4440.94,1409.45 4440.94,1850.39 4842.52,1850.39 4842.52,1409.45
VBUS on L6 Bottom "PWR_VBUS_L6" (solid, remove dead copper, pour order 916): 1244.09,1811.02 1244.09,2149.61 1366.14,2149.61 1366.14,2464.57 1716.54,2464.57 1716.54,2011.81 1366.14,2011.81 1366.14,1811.02
V_FUSED on L6 Bottom "PWR_V_FUSED_L6" (solid, remove dead copper, pour order 915): 4027.56,2480.32 4027.56,2716.54 4232.28,2716.54 4232.28,2480.32
BAT_SRC on L6 Bottom "PWR_BAT_SRC_L6" (solid, remove dead copper, pour order 914): 4039.37,2338.58 4039.37,2458.66 4232.28,2458.66 4232.28,2338.58
BAT_SENSE on L6 Bottom "PWR_BAT_SENSE_L6" (solid, remove dead copper, pour order 913): 4418.11,1966.93 4228.35,1966.93 4228.35,2120.08 4027.56,2120.08 4027.56,2336.61 4228.35,2336.61 4228.35,2263.78 4418.11,2263.78
V_BAT on L6 Bottom "PWR_V_BAT_W_L6" (solid, remove dead copper, pour order 912): 3858.27,1901.57 3858.27,2007.87 4216.54,2007.87 4216.54,1901.57
V_BAT on L6 Bottom "PWR_V_BAT_L6" (solid, remove dead copper, pour order 911): 4328.74,1600.39 4328.74,1955.12 4431.1,1955.12 4431.1,1980.32 4576.77,1980.32 4576.77,1862.2 4429.13,1862.2 4429.13,1600.39
V_SYS on L6 Bottom "PWR_V_SYS_R3_L6" (solid, remove dead copper, pour order 910): 4078.74,1496.06 4078.74,1889.76 4202.76,1889.76 4202.76,1852.36 4285.43,1852.36 4285.43,1600.39 4202.76,1600.39 4202.76,1496.06
GND on L6 Bottom "GND_BANK2_L6" (solid, remove dead copper, pour order 909): 3858.27,1496.06 3858.27,1889.76 4066.93,1889.76 4066.93,1496.06
V_SYS on L6 Bottom "PWR_V_SYS_LEG_L6" (solid, remove dead copper, pour order 908): 3763.78,1824.8 3559.06,1824.8 3559.06,1958.66 3492.13,1958.66 3492.13,2068.9 3826.77,2068.9 3826.77,1889.76 3846.46,1889.76 3846.46,1496.06 3763.78,1496.06
GND on L6 Bottom "GND_HOT2_L6" (solid, remove dead copper, pour order 907): 3452.76,2070.87 3452.76,2165.35 3716.54,2165.35 3716.54,2070.87
GND on L6 Bottom "GND_LEG2_L6" (solid, remove dead copper, pour order 906): 3269.68,1387.8 3269.68,1561.02 3498.03,1561.02 3498.03,1574.8 3559.06,1574.8 3559.06,1716.54 3751.97,1716.54 3751.97,1387.8
BQ_SW2 on L6 Bottom "PWR_SW2_L6" (solid, remove dead copper, pour order 905): 3269.68,1655.51 3322.83,1655.51 3322.83,1889.76 3433.07,1889.76 3433.07,1956.69 3543.31,1956.69 3543.31,1822.83 3600.39,1822.83 3600.39,1716.54 3543.31,1716.54 3543.31,1582.68 3498.03,1582.68 3498.03,1572.83 3269.68,1572.83
BQ_SW1 on L6 Bottom "PWR_SW1_L6" (solid, remove dead copper, pour order 904): 3240.16,1582.68 3023.62,1582.68 3023.62,1716.54 2988.19,1716.54 2988.19,1822.83 3023.62,1822.83 3023.62,1956.69 3133.86,1956.69 3133.86,1889.76 3240.16,1889.76
GND on L6 Bottom "GND_LEG1_L6" (solid, remove dead copper, pour order 903): 2844.49,1824.8 2844.49,2125.98 2998.03,2125.98 2998.03,2000 2988.19,2000 2988.19,1824.8
GND on L6 Bottom "GND_HOT1_L6" (solid, remove dead copper, pour order 902): 2844.49,1399.61 2844.49,1456.69 3137.8,1456.69 3137.8,1399.61
GND on L6 Bottom "GND_BANK1_L6" (solid, remove dead copper, pour order 901): 2531.5,1366.14 2531.5,1897.64 2687.01,1897.64 2687.01,1366.14
VAC on L6 Bottom "PWR_VAC_BANK_L6" (solid, remove dead copper, pour order 900): 2326.77,1366.14 2326.77,1897.64 2492.13,1897.64 2492.13,1366.14
VAC on L6 Bottom "PWR_VAC_L6" (solid, remove dead copper, pour order 899): 3114.17,1468.5 2832.68,1468.5 2832.68,1366.14 2728.35,1366.14 2728.35,1897.64 2832.68,1897.64 2832.68,1714.57 2988.19,1714.57 2988.19,1574.8 3114.17,1574.8
GND on L1 Top "GND_D1_L1" (solid, remove dead copper, pour order 937): 3811.02,3015.75 3811.02,3181.1 3921.26,3181.1 3921.26,3015.75
GND on L1 Top "GND_C11_L1" (solid, remove dead copper, pour order 936): 2598.43,2519.68 2598.43,2669.29 2811.02,2669.29 2811.02,2519.68
GND on L1 Top "GND_C2_L1" (solid, remove dead copper, pour order 935): 2452.76,1204.72 2452.76,1433.07 2562.99,1433.07 2562.99,1204.72
GND on L1 Top "GND_C1_L1" (solid, remove dead copper, pour order 934): 2429.13,2078.74 2429.13,2299.21 2562.99,2299.21 2562.99,2078.74
GND on L1 Top "GND_C19_L1" (solid, remove dead copper, pour order 933): 4476.38,2015.75 4196.85,2015.75 4196.85,2372.05 4314.96,2372.05 4314.96,2450.79 4409.45,2450.79 4409.45,2271.65 4476.38,2271.65
GND on L1 Top "GND_BAT_L1" (solid, remove dead copper, pour order 932): 3913.39,1259.84 3913.39,1444.88 4208.66,1444.88 4208.66,1677.17 4437.01,1677.17 4437.01,1850.39 4842.52,1850.39 4842.52,1409.45 4511.81,1409.45 4511.81,1259.84
+V_BATT on L1 Top "PWR_V_BATT_L1" (solid, remove dead copper, pour order 931): 4206.69,2724.41 4206.69,3212.6 4846.46,3212.6 4846.46,2724.41
V_FUSED on L1 Top "PWR_V_FUSED_L1" (solid, remove dead copper, pour order 930): 4232.28,2476.38 3826.77,2476.38 3826.77,2984.25 3988.19,2984.25 3988.19,3165.35 4161.42,3165.35 4161.42,2984.25 4194.88,2984.25 4194.88,2712.6 4232.28,2712.6
V_BAT on L1 Top "PWR_V_BAT_D2_L1" (solid, remove dead copper, pour order 929): 4248.03,1755.91 4248.03,1893.7 4425.2,1893.7 4425.2,1755.91
V_BAT on L1 Top "PWR_V_BAT_L1" (solid, remove dead copper, pour order 928): 3834.65,1879.92 3834.65,2440.94 4149.61,2440.94 4149.61,1879.92
V_SYS on L1 Top "PWR_V_SYS_L1" (solid, remove dead copper, pour order 927): 4196.85,1456.69 3622.05,1456.69 3622.05,2043.31 3822.83,2043.31 3822.83,1866.14 4196.85,1866.14
BQ_SW2 on L1 Top "PWR_SW2_L1" (solid, remove dead copper, pour order 926): 3318.9,1539.37 3318.9,1913.39 3606.3,1913.39 3606.3,1539.37
BQ_SW1 on L1 Top "PWR_SW1_L1" (solid, remove dead copper, pour order 925): 3110.24,1539.37 3110.24,1641.73 2976.38,1641.73 2976.38,1913.39 3248.03,1913.39 3248.03,1539.37
VAC on L1 Top "PWR_VAC_L1" (solid, remove dead copper, pour order 924): 2244.09,1366.14 2244.09,2141.73 2013.78,2141.73 2013.78,2265.75 2267.72,2265.75 2267.72,1952.76 2834.65,1952.76 2834.65,1639.76 2555.12,1639.76 2555.12,1456.69 2440.94,1456.69 2440.94,1366.14
VBUS_SW on L1 Top "PWR_VBUS_SW_L1" (solid, remove dead copper, pour order 923): 1850.39,2433.07 1850.39,2496.06 2255.91,2496.06 2255.91,2685.04 2464.57,2685.04 2464.57,2328.74 2255.91,2328.74 2255.91,2326.77 2013.78,2326.77 2013.78,2407.48 1952.76,2407.48 1952.76,2232.28 1846.46,2232.28 1846.46,2433.07
VBUS_CS on L1 Top "PWR_VBUS_CS_L1" (solid, remove dead copper, pour order 922): 1704.72,2228.35 1704.72,2370.08 1828.74,2370.08 1828.74,2228.35
GND on L1 Top "GND_D9_L1" (solid, remove dead copper, pour order 921): 1267.72,2250 1267.72,2433.07 1381.89,2433.07 1381.89,2250
VBUS on L1 Top "PWR_VBUS_L1" (solid, remove dead copper, pour order 920): 1393.7,2177.17 1393.7,2433.07 1570.87,2433.07 1570.87,2521.65 1690.94,2521.65 1690.94,2177.17
+V_BATT on L3 Power "PWR_V_BATT_L3" (solid, remove dead copper, pour order 943): 4244.09,2724.41 4244.09,3212.6 4846.46,3212.6 4846.46,2724.41
V_FUSED on L3 Power "PWR_V_FUSED_L3" (solid, remove dead copper, pour order 942): 3826.77,2476.38 3826.77,2984.25 4232.28,2984.25 4232.28,2476.38
BAT_SENSE on L3 Power "PWR_BAT_SENSE_L3" (solid, remove dead copper, pour order 941): 4418.11,1966.93 4228.35,1966.93 4228.35,2120.08 4027.56,2120.08 4027.56,2336.61 4228.35,2336.61 4228.35,2244.09 4418.11,2244.09
V_BAT on L3 Power "PWR_V_BAT_L3" (solid, remove dead copper, pour order 940): 4328.74,1600.39 4328.74,1901.57 3903.54,1901.57 3903.54,1955.12 4476.38,1955.12 4476.38,2244.09 4655.51,2244.09 4655.51,1955.12 4576.77,1955.12 4576.77,1901.57 4437.01,1901.57 4437.01,1600.39
V_SYS on L3 Power "PWR_V_SYS_L3" (solid, remove dead copper, pour order 939): 3763.78,1496.06 3763.78,1730.32 3649.61,1730.32 3649.61,1958.66 3492.13,1958.66 3492.13,2068.9 3838.58,2068.9 3838.58,1858.27 4265.75,1858.27 4265.75,1627.95 4220.47,1627.95 4220.47,1496.06
VAC on L3 Power "PWR_VAC_L3" (solid, remove dead copper, pour order 938): 2244.09,1366.14 2244.09,2141.73 2013.78,2141.73 2013.78,2263.78 2267.72,2263.78 2267.72,1952.76 2850.39,1952.76 2850.39,1732.28 2909.45,1732.28 2909.45,1366.14
+V_BATT on L4 Power "PWR_V_BATT_L4" (solid, remove dead copper, pour order 951): 4244.09,2724.41 4244.09,3212.6 4846.46,3212.6 4846.46,2724.41
V_FUSED on L4 Power "PWR_V_FUSED_L4" (solid, remove dead copper, pour order 950): 3826.77,2476.38 3826.77,2984.25 4232.28,2984.25 4232.28,2476.38
BAT_SENSE on L4 Power "PWR_BAT_SENSE_R1_L4" (solid, remove dead copper, pour order 949): 4296.06,1966.93 4296.06,2244.09 4418.11,2244.09 4418.11,1966.93
BAT_SENSE on L4 Power "PWR_BAT_SENSE_L4" (solid, remove dead copper, pour order 948): 4266.14,1966.93 4228.35,1966.93 4228.35,2120.08 4027.56,2120.08 4027.56,2336.61 4228.35,2336.61 4228.35,2244.09 4266.14,2244.09
V_BAT on L4 Power "PWR_V_BAT_W_L4" (solid, remove dead copper, pour order 947): 3903.54,1901.57 3903.54,1955.12 4266.14,1955.12 4266.14,1901.57
V_BAT on L4 Power "PWR_V_BAT_L4" (solid, remove dead copper, pour order 946): 4328.74,1600.39 4328.74,1901.57 4296.06,1901.57 4296.06,1955.12 4476.38,1955.12 4476.38,2244.09 4655.51,2244.09 4655.51,1955.12 4576.77,1955.12 4576.77,1901.57 4437.01,1901.57 4437.01,1600.39
V_SYS on L4 Power "PWR_V_SYS_L4" (solid, remove dead copper, pour order 945): 4285.43,1496.06 3763.78,1496.06 3763.78,1730.32 3688.98,1730.32 3688.98,2068.9 3846.46,2068.9 3846.46,1889.76 4285.43,1889.76
VAC on L4 Power "PWR_VAC_L4" (solid, remove dead copper, pour order 944): 2244.09,1366.14 2244.09,2141.73 2013.78,2141.73 2013.78,2263.78 2267.72,2263.78 2267.72,1952.76 2850.39,1952.76 2850.39,1732.28 2909.45,1732.28 2909.45,1366.14

## Silkscreen, mask and mechanical layers (free items; w line width, h text height)
Mechanical 1:
  the board outline again, w3.94
Mechanical 2:
  lines w3.94: 2748.03,3047.24 2748.03,3303.15 3125.98,3303.15 3125.98,3047.24 2748.03,3047.24
  lines w7.87: 1433.07,3582.68 1433.07,3834.65 2456.69,3834.65 2456.69,3582.68 1433.07,3582.68 ; 2807.09,1409.45 2807.09,2129.92 3759.84,2129.92 3759.84,1409.45 2807.09,1409.45 ; 3842.52,1897.64 4177.17,1897.64 4177.17,1527.56 4429.13,1527.56 4429.13,2692.91 3842.52,2692.91 3842.52,1897.64